# Altium PCB Custom_Keyboard.PcbDoc (part 4 of 4)
Units mil, origin at the board's own origin, x right, y up, seen from the top; angles counter-clockwise.
Board outline 4767 x 2153 mil, 2 copper layers (Top Layer, Bottom Layer), stack 57 mil thick; 298 components, 247 nets, 1117 pads, 576 vias.
Unrouted connection lines stored in the file: 2.
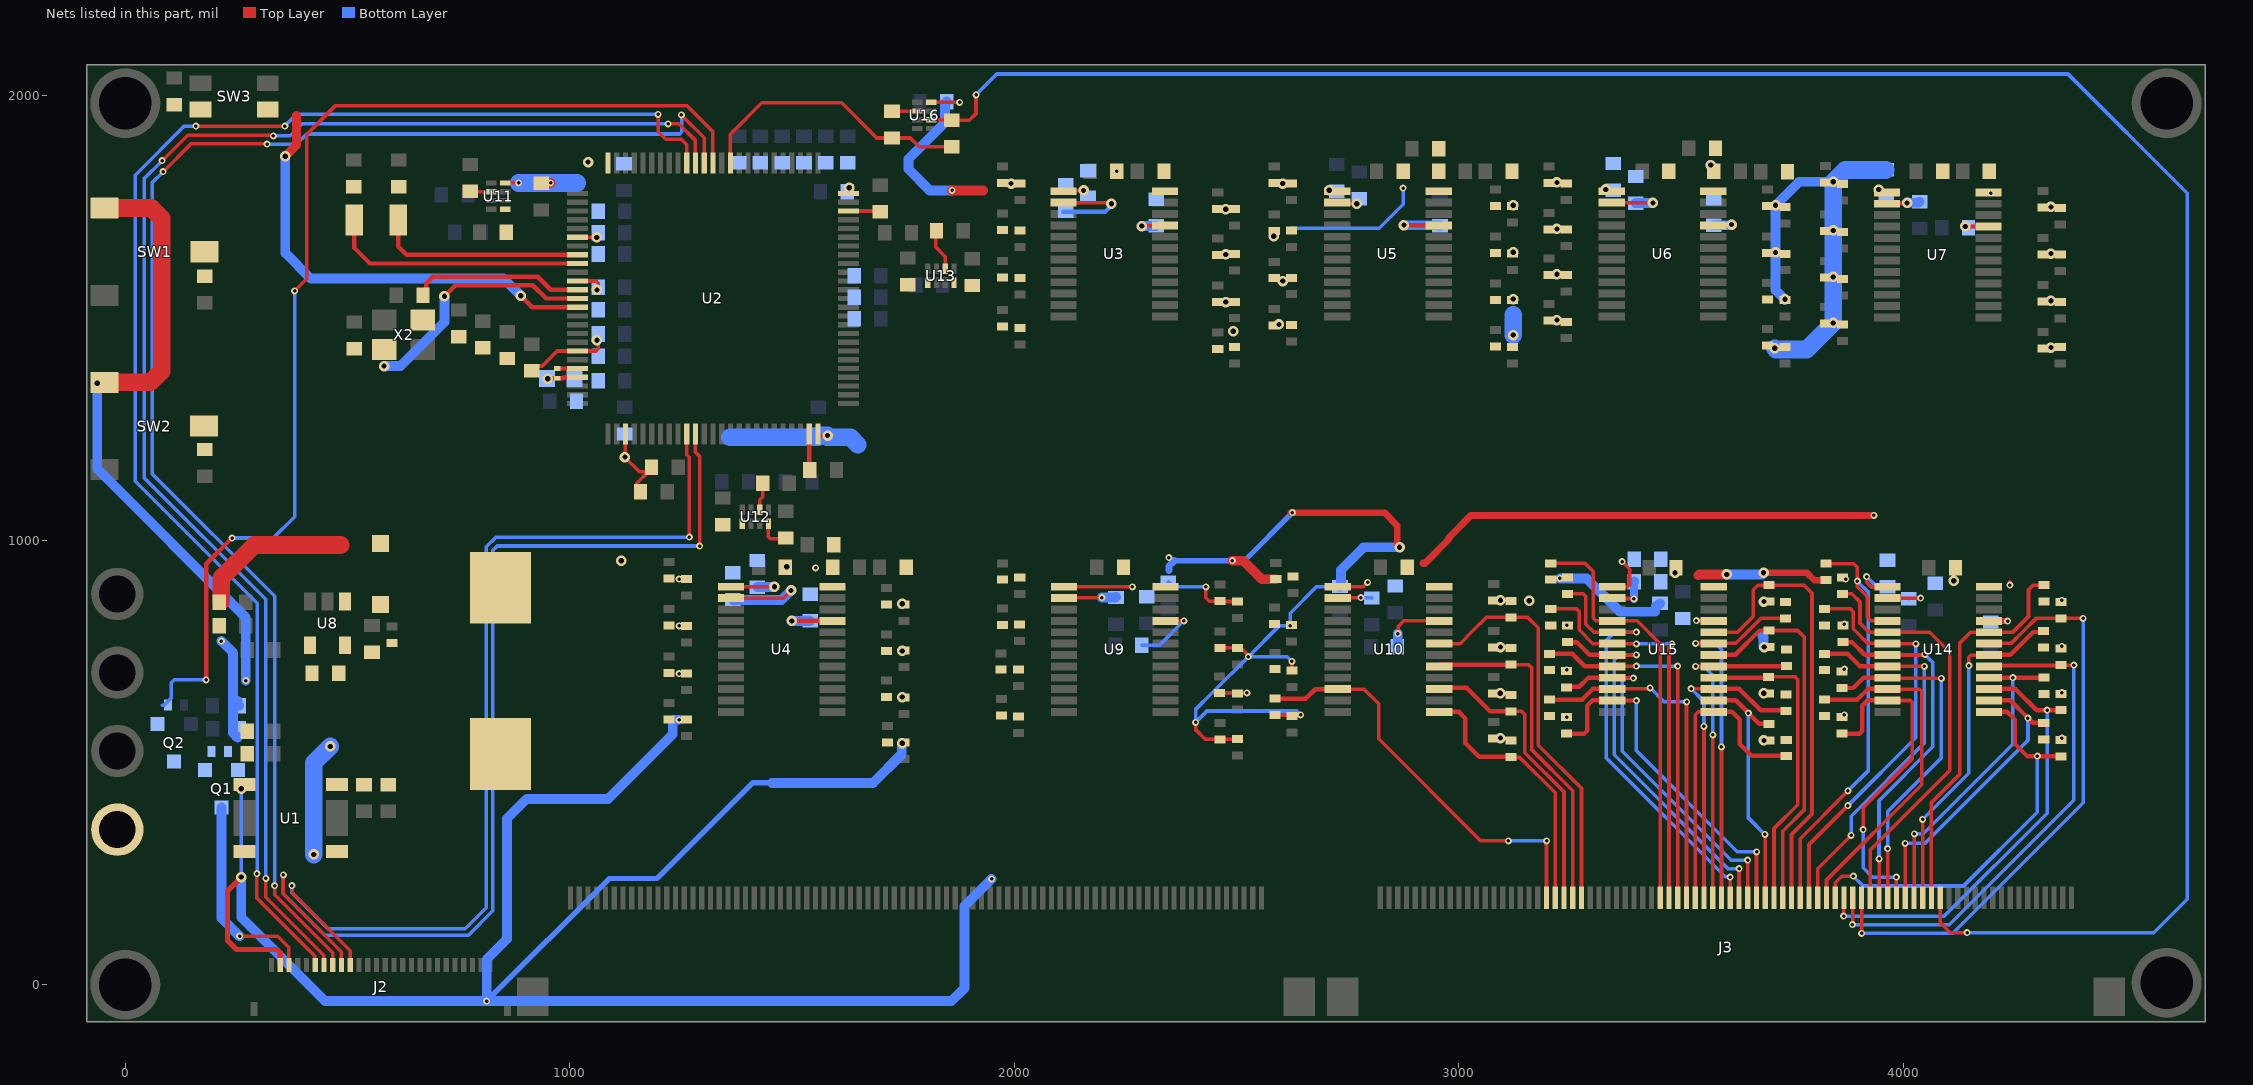
[diagram p3: the nets of this part, all layers, seen from the top]

## Via types
v1: diameter 15.75, hole 7.87, Top Layer to Bottom Layer, tented both sides, 451 vias
v2: diameter 23.62, hole 11.81, Top Layer to Bottom Layer, tented both sides, 125 vias

## Nets (pads, with @x,y where several pads share a name; then routed paths per layer and width w, separated by ;. In a path a pad name is that pad's centre, name@x,y a point inside that pad or via, vN(x,y) a via of type N, cw(c..) or ccw(c..) an arc to the next point about the centre after c; other vN are vias at no path point) (continued)
MUX_7.SDA_52: J3.20 R170.1 U10.10 | length 935.6
  Top Layer w8: U10.10@2728,664.93 2787.07,664.93 2820,632 2820,553 3049.67,323.33 v1(3112,323.33) ; J3.20@3197.66,195.44 v1@3197.66,323.33
  Top Layer w10: R170.1@2586.83,643.7 2656.26,643.7 2677.49,664.93 U10.10@2728,664.93
  Bottom Layer w8: v1(3112,323.33) v1(3198,323.33)
MUX_7.SDA_53: J3.21 R178.1 U10.13 | length 604.9
  Top Layer w8: R178.1@3118,512.7 3119.52,511.19 3137.81,511.19 3217.35,431.65 J3.21@3217.35,195.44
  Top Layer w10: U10.13@2956.35,613.75 2999.87,613.75 3014.96,598.66 3014.96,543.66 3045.91,512.7 R178.1@3118,512.7
MUX_7.SDA_54: J3.22 R186.1 U10.15 | length 664.4
  Top Layer w8: R186.1@3118,614.7 3142.3,614.7 3149,608 3149,522 3237.03,433.97 J3.22@3237.03,195.44
  Top Layer w10: U10.15@2956.35,667.64 3016.24,667.64 ; 3018.24,667.64 3071.17,614.7 R186.1@3118,614.7
MUX_7.SDA_55: J3.23 R194.1 U10.17 | length 765.2
  Top Layer w8: R194.1@3117.57,720.27 3156.73,720.27 3164,713 3164,529 3256.72,436.28 J3.23@3256.72,195.44
  Top Layer w10: U10.17@2957.8,720.27 R194.1@3117.57,720.27
MUX_7.SDA_56: J3.24 R202.1 U10.19 | length 904.6
  Top Layer w8: U10.19@2956.35,767.3 3003.23,767.3 3033.17,797.24 3062.14,826.2 R202.1@3118,826.2 3155.8,826.2 3179,803 3179,539 3276.4,441.6 J3.24@3276.4,195.44
MUX_8.SCL_57: J3.41 R151.1 U15.5 | length 1004
  Top Layer w8: R151.1@3244.65,879.32 3280.14,879.32 3286,873.46 3286,811.29 3303.88,793.41 U15.5@3345.65,793.41 ; U15.5@3345.65,792.89 3399.89,792.89 v1(3400,793) ; J3.41@3611.02,195.46 v1(3611,242)
  Bottom Layer w8: v1(3400,793) 3350.69,793 3332,774.31 3332,510 3599.45,242.55 3610.45,242.55 v1(3611,242)
MUX_8.SCL_58: J3.42 R159.1 U15.7 | length 889
  Top Layer w8: U15.7@3345.65,741.7 3401.7,741.7 v1@3402,742 ; J3.42@3630.73,195.44 v1@3630.73,260.51
  Top Layer w10: R159.1@3245.31,770.89 3265.81,770.89 3294.47,742.23 U15.7@3345.65,742.23
  Bottom Layer w8: v1(3400,742) 3362,742 3350,730 3350,517 3606,261 v1(3631.22,261)
MUX_8.SCL_59: J3.43 R167.1 U15.9 | length 811.8
  Top Layer w8: U15.9@3345.65,691.05 3346.44,690.26 3392.74,690.26 v1(3393,690) ; v1@3650.22,278 3650.32,277.9 J3.43@3650.32,195.54
  Top Layer w10: R167.1@3242.25,670.52 3271.59,670.52 3292.12,691.05 U15.9@3345.65,691.05
  Bottom Layer w8: v1(3393,690) 3375,690 3368,683 3368,525 3613,280 v1(3650.22,280)
MUX_8.SCL_60: J3.44 R175.1 U15.11 | length 796.3
  Top Layer w8: U15.11@3345.65,639.34 v1@3400.7,639.34 ; J3.44@3670,202 3670.16,202.16 3670.16,298.94 v1(3670.22,299)
  Top Layer w10: R175.1@3243,565.02 3282.97,565.02 3288.83,570.88 3288.83,627.52 3301.17,639.87 U15.11@3345.65,639.87
  Bottom Layer w8: v1(3400,639.05) 3400,526 3627,299 v1(3670.22,299)
MUX_8.SCL_61: J3.45 R183.1 U15.14 | length 577.6
  Top Layer w8: v1(3689,338) 3689.39,337.61 3689.39,195.83 J3.45@3689.79,195.44
  Top Layer w10: U15.14@3574,639.87 3623.13,639.87 3676.36,586.64 3692.51,586.64 R183.1@3696.65,582.5
  Bottom Layer w8: v1(3652,611) 3652,375 v1(3689,338)
MUX_8.SCL_62: J3.46 R191.1 U15.16 | length 705.3
  Top Layer w8: R191.1@3696,691.05 R191.1@3697.48,692.52 3756.84,692.52 3763,686.36 3763,405 3709.47,351.47 J3.46@3709.47,195.44
  Top Layer w10: U15.16@3574,691.05 R191.1@3696,691.05
MUX_8.SCL_63: J3.47 R199.1 U15.18 | length 839.6
  Top Layer w8: R199.1@3698.33,796.85 3763.15,796.85 3778,782 3778,394 3729.16,345.16 J3.47@3729.16,195.44
  Top Layer w10: U15.18@3574,742.23 3622.39,742.23 3677.01,796.85 R199.1@3698.33,796.85
MUX_8.SCL_64: J3.48 R207.1 U15.20 | length 1012.3
  Top Layer w8: U15.20@3574,793.41 3627.97,793.41 3633.83,799.27 3663,828.44 3663,888.88 3673.15,899.02 R207.1@3698,899.02 3776.98,899.02 3795,881 3795,384 3748.84,337.84 J3.48@3748.84,195.44
MUX_8.SDA_57: J3.33 R147.1 U15.4 | length 952
  Top Layer w8: R147.1@3207.07,948.09 3284.26,948.09 3302.83,929.52 3302.83,824.86 3307.37,820.32 ; 3308.68,819 U15.4@3345.65,819 ; U15.4@3345.65,818.48 3401.52,818.48 3453.57,766.43 J3.33@3453.57,195.44
MUX_8.SDA_58: J3.34 R155.1 U15.6 | length 905.6
  Top Layer w8: R155.1@3207.25,845.34 3265.14,845.34 3271,839.48 3271,798.35 3302.06,767.3 U15.6@3345.65,767.3 3400.7,767.3 v1@3401,767 ; J3.34@3473.25,195.44 3473.25,759.16 3480,765.9 v1@3480,768
  Bottom Layer w8: v1(3400,767) v1(3480,767)
MUX_8.SDA_59: J3.35 R163.1 U15.8 | length 819.2
  Top Layer w8: U15.8@3345.65,716.64 v1@3399.89,716.64 ; v1@3492.47,714.53 3492.47,195.91 J3.35@3492.94,195.44
  Top Layer w10: R163.1@3204,744.52 3255.83,744.52 3283.71,716.64 U15.8@3345.65,716.64
  Bottom Layer w8: v1(3400,716.75) v1(3492.47,716.75)
MUX_8.SDA_60: J3.36 R171.1 U15.10 | length 771
  Top Layer w8: U15.10@3345.65,665.46 3426.36,665.46 3428.9,668 v1(3431,668) ; J3.36@3512.62,195.44 v1@3512.62,635.9
  Top Layer w10: R171.1@3204.48,641.52 3277.87,641.52 3301.8,665.46 U15.10@3345.65,665.46
  Bottom Layer w8: v1(3431,668) 3462.91,636.09 v1@3510.81,636.09
  other v1: 3512.81,636.09
MUX_8.SDA_61: J3.37 R179.1 U15.13 | length 692.6
  Top Layer w8: J3.37@3532.31,195.44 3532.31,607.31 3538.75,613.75 U15.13@3574,613.75
  Top Layer w10: U15.13@3574,614.28 3614.82,614.28 3632.61,596.48 3632.61,541.48 3659.09,515 R179.1@3737,515
MUX_8.SDA_62: J3.38 R187.1 U15.15 | length 716.5
  Top Layer w8: v1(3523,666) 3523.53,665.47 3573.47,665.47 U15.15@3574,664.93 ; J3.38@3551.99,195.44 v1(3552,581)
  Top Layer w10: U15.15@3574,665.46 3631.54,665.46 3679.48,617.52 R187.1@3736.65,617.52
  Bottom Layer w8: v1(3523,666) 3552,637 v1(3552,581)
MUX_8.SDA_63: J3.39 R195.1 U15.17 | length 754.3
  Top Layer w8: v1(3533,716) 3533.06,716.06 3573.94,716.06 U15.17@3574,716.11 ; J3.39@3571.68,195.44 3571.68,561.68 v1(3572,562)
  Top Layer w10: U15.17@3574,716.11 3728.74,716.11 3733.72,721.09 R195.1@3737.22,721.09
  Bottom Layer w8: v1(3533,716) 3533.87,715.13 3552.87,715.13 3572,696 v1(3572,562)
MUX_8.SDA_64: J3.40 R203.1 U15.19 | length 849.3
  Top Layer w8: v1(3533,768) 3533.35,767.65 3573.65,767.65 U15.19@3574,767.3 ; U15.19@3574,767.82 3623.59,767.82 3650.83,795.05 3679.8,824.02 R203.1@3735.65,824.02 ; J3.40@3591.36,195.44 v1(3591.36,535)
  Bottom Layer w8: v1(3533,768) 3578,768 3591.36,754.64 v1(3591.36,535)
MUX_9.SCL_65: J3.57 R152.1 U14.5 | length 949.9
  Top Layer w8: R152.1@3863.83,879.3 3884.7,879.3 3903,861 3903,813.43 3923.05,793.39 U14.5@3964.83,793.39 ; J3.57@3926.01,195.44 3926.01,303.01 4105,482 4105,748 4060.11,792.89 U14.5@3964.83,792.89
MUX_9.SCL_66: J3.58 R160.1 U14.7 | length 802.4
  Top Layer w8: J3.58@3945.69,195.44 3945.85,195.59 3945.85,282.85 v1(3946,283) ; U14.7@3964.83,741.7 4046.7,741.7 4048,743 v1(4049,743)
  Top Layer w10: R160.1@3864.48,770.87 3884.98,770.87 3913.64,742.2 U14.7@3964.83,742.2
  Bottom Layer w8: v1(3946,283) 3945.69,283.31 3945.69,413.69 4067,535 4067,725 v1(4049,743)
MUX_9.SCL_67: J3.59 R168.1 U14.9 | length 780.8
  Top Layer w8: U14.9@3964.83,690.52 3965.59,689.76 4088.24,689.76 v1@4089,689 ; v1(3965.09,305.91) 3965.19,305.81 3965.19,195.63 J3.59@3965.38,195.44
  Top Layer w10: R168.1@3862.42,667.5 3887.77,667.5 3911.29,691.02 U14.9@3964.83,691.02
  Bottom Layer w8: v1(3965.09,305.91) 3965,306 3965,389 4086,510 v1(4086,689)
MUX_9.SCL_68: J3.60 R176.1 U14.11 | length 772.5
  Top Layer w8: v1(3910,349) 3910,398 4021,509 4021,634 4015.66,639.34 U14.11@3964.83,639.34 ; J3.60@3985.03,195.47 v1(3985,242)
  Top Layer w10: R176.1@3862.17,565 3902.14,565 3908,570.86 3908,627.5 3920.34,639.84 U14.11@3964.83,639.84
  Bottom Layer w8: v1(3910,349) 3910,263 3931,242 v1(3985,242)
MUX_9.SCL_69: J3.61 R184.1 U14.14 | length 689
  Top Layer w8: J3.61@4004.75,195.44 v1@4004.75,317.75
  Top Layer w10: U14.14@4193.17,639.84 4241.16,639.84 v1(4281,600) 4292,589 R184.1@4316.33,589
  Bottom Layer w8: v1(4004.72,317.78) 4048.78,317.78 4281,550 v1(4281,600)
MUX_9.SCL_70: J3.62 R192.1 U14.16 | length 722.3
  Top Layer w8: J3.62@4024.59,195.59 4025.22,196.22 v1(4025.22,339.22)
  Top Layer w10: U14.16@4193.17,691.02 4261.48,691.02 R192.1@4316.18,691.02
  Bottom Layer w8: v1(4025.22,339.22) 4045.22,339.22 4247,541 v1(4247,691)
MUX_9.SCL_71: J3.63 R200.1 U14.18 | length 775.4
  Top Layer w8: J3.63@4044.12,195.44 v1(4044.12,371.88) ; v1(4148,718) 4148,736.67 4152.69,741.35 4192.82,741.35 U14.18@4193.17,741.7
  Top Layer w10: U14.18@4193.17,742.2 4241.56,742.2 4292.86,793.5 R200.1@4315.83,793.5
  Bottom Layer w8: v1(4044.12,371.88) 4148,475.76 v1(4148,718)
MUX_9.SCL_72: J3.64 R208.1 U14.20 | length 878.5
  Top Layer w8: J3.64@4063.8,195.44 4063.8,242 4063.8,409.8 4127,473 4127,768.24 4151.65,792.89 U14.20@4193.17,792.89 ; U14.20@4193.17,793.39 4247.14,793.39 4253,799.24 4282.17,828.42 4282.17,888.85 4292.32,899 R208.1@4317.17,899
MUX_9.SDA_65: J3.49 R148.1 U14.4 | length 1030.2
  Top Layer w8: J3.49@3768.53,195.44 3768.53,328.53 v1(3876,436) ; R148.1@3826.42,947.07 3888.93,947.07 3897,939 3897,895 3919,873 3919,827.83 3927.86,818.98 U14.4@3964.83,818.98
  Bottom Layer w8: v1(3876,436) 3922,482 3922,883 v1(3897,908)
MUX_9.SDA_66: J3.50 R156.1 U14.6 | length 928.2
  Top Layer w8: J3.50@3788.21,195.44 3788.21,315.21 v1(3876,403) ; R156.1@3826.42,845.32 3881.64,845.32 3888,838.96 3888,800.5 3920.7,767.8 U14.6@3964.83,767.8 ; U14.6@3964.83,767.3 3964.97,767.15 4028.54,767.15 v1(4028.69,767)
  Bottom Layer w8: v1(3876,403) 4028.69,555.69 v1(4028.69,767)
MUX_9.SDA_67: J3.51 R164.1 U14.8 | length 856.2
  Top Layer w8: J3.51@3807.9,195.44 3807.9,260.9 v1(3883,336) ; U14.8@3964.83,716.11 4047.89,716.11 v1(4048,716)
  Top Layer w10: R164.1@3823.17,744.5 3875,744.5 3902.89,716.61 U14.8@3964.83,716.61
  Bottom Layer w8: v1(3883,336) 3883,379 4048,544 v1@4048,715.73
MUX_9.SDA_68: J3.52 R172.1 U14.10 | length 783.8
  Top Layer w8: J3.52@3827.58,195.44 3827.58,235.58 4042,450 4042,660.25 4037.31,664.93 U14.10@3964.83,664.93
  Top Layer w10: R172.1@3823.65,641.5 3897.04,641.5 3920.97,665.43 U14.10@3964.83,665.43
MUX_9.SDA_69: J3.53 R180.1 U14.13 | length 933.7
  Top Layer w8: J3.53@3847.27,195.44 3847.27,229.27 3853.12,235.12 3862.13,244.13 3887.87,244.13 v1(3888,244)
  Top Layer w10: U14.13@4193.17,614.25 4233.99,614.25 4251.79,596.45 4251.79,541.45 4279.74,513.5 v1@4302,513.5 ; v1@4302.5,513.5 R180.1@4354.83,513.5
  Bottom Layer w8: v1(3888,244) 3910,222 4136,222 4302,388 v1(4302,514)
MUX_9.SDA_70: J3.54 R188.1 U14.15 | length 1009.4
  Top Layer w8: v1(3866,154) 3866.48,154.48 3866.48,194.96 J3.54@3866.95,195.44
  Top Layer w10: U14.15@4193.17,665.43 4252.57,665.43 4300.5,617.5 4324,617.5 R188.1@4354.83,617.5
  Bottom Layer w8: v1(3866,154) 4092,154 4324,386 v1(4324,618)
MUX_9.SDA_71: J3.55 R196.1 U14.17 | length 1165.6
  Top Layer w8: v1(3886,135) 3886.32,135.32 3886.32,193.4 J3.55@3886.82,193.9 ; R196.1@4355.43,719.03 v1(4384,719)
  Top Layer w10: U14.17@4194.63,718.07 R196.1@4354.39,718.07
  Bottom Layer w8: v1(3886,135) 4104,135 4384,415 v1(4384,719)
MUX_9.SDA_72: J3.56 R204.1 U14.19 | length 1353.4
  Top Layer w8: J3.56@3906.32,195.44 J3.56@3907.66,194.1 ; v1(3906.66,115.34) J3.56@3906.66,194.1 ; U14.19@4193.17,767.8 4242.76,767.8 4270,795.03 4298.97,824 R204.1@4354.83,824 v1(4405,824)
  Bottom Layer w8: v1@3905,115.34 v1(3906.66,115.34) 4111.34,115.34 4405,409 v1(4405,824) v1@4405,825
NetC14_1: C14.1 U2.49 | length 81.3
  Top Layer w10: U2.49@1538.65,1238.76 1538.65,1159.35 C14.1@1540,1158
NetC15_1: C15.1 U2.73 | length 72.5
  Top Layer w10: U2.73@1627.23,1740.73 1697.27,1740.73 C15.1@1699,1739
NetQ1_1: Q1.1 Q2.3 R4.2
NetR2_2: R2.2 SW1.2
NetR3_2: R3.2 SW2.2
NetR7_1: R7.1 U9.1 | length 153.9
  Top Layer w8: U9.1@2112.17,895.25 2265.75,895.25 v1(2266,895)
NetR8_1: R8.1 U9.2 | length 117.8
  Top Layer w8: U9.2@2112.17,869.66 2112.84,870.33 2196.33,870.33 v1(2197,871)
  Bottom Layer w22: v1(2197,871) 2228,871 R8.1@2229,872
NetR10_1: R10.1 U3.1 | length 45.9
  Top Layer w8: U3.1@2110.83,1785.25 2111.7,1786.12 2155.12,1786.12 v2(2156,1787)
NetR12_1: R12.1 U3.2 | length 233.1
  Top Layer w8: U3.2@2110.83,1759.66 2111.56,1758.92 2220.89,1758.92 v2@2222.81,1757
  Bottom Layer w10: R12.1@2110,1739.5 R12.1@2116,1739.5 2205.31,1739.5 v2@2222.81,1757
  other v2: 2218.81,1757
NetR14_1: R14.1 U4.1 | length 136.3
  Top Layer w8: U4.1@1362.83,895.25 1362.89,895.31 1460.31,895.31 v2(1460.38,895.37)
  Bottom Layer w22: R14.1@1422,894.5 1422.56,895.06 1460.07,895.06 v2(1460.38,895.37)
NetR15_1: R15.1 U3.21 | length 86
  Top Layer w8: v2(2287,1707) 2287.74,1707.74 2338.44,1707.74 U3.21@2339.17,1708.48
  Bottom Layer w22: v2(2287,1707) 2287.25,1707.25 2319.75,1707.25 R15.1@2320,1707.5
NetR16_1: R16.1 U4.2 | length 283.9
  Top Layer w8: U4.2@1362.83,869.66 1480.66,869.66 v2(1498,887)
  Bottom Layer w22: R16.1@1367,866.5 1369.5,864 1371,865.5 1476.5,865.5 v2(1498,887)
NetR18_1: R18.1 U4.21 | length 139.6
  Top Layer w10: v2(1499.52,818.48) U4.21@1591.17,818.48
  Bottom Layer w22: v2(1499.52,818.48) R18.1@1541,818.5 ; R18.1@1531.51,819.5 R18.1@1538,819.5
NetR21_1: R21.1 U5.1 | length 19.5
  Top Layer w8: U5.1@2708.75,1786.75 v2(2708.75,1787.33) 2710.83,1785.25 U5.1@2726.83,1785.25
NetR22_1: R22.1 U5.2 | length 45.3
  Top Layer w8: U5.2@2726.83,1759.66 2728.22,1758.27 2769.58,1758.27 v2(2770.97,1756.88)
NetR24_1: R24.1 U5.21 | length 160.4
  Top Layer w10: v2(2876.81,1709) 2877.07,1708.74 2954.91,1708.74 U5.21@2955.17,1708.48
  Bottom Layer w22: v2(2876.81,1709) 2877.12,1708.69 2956.81,1708.69 R24.1@2958,1707.5
NetR28_1: R28.1 U9.21 | length 158
  Top Layer w8: U9.21@2340.52,818.48 v1(2381.48,818.48)
  Bottom Layer w8: R28.1@2287,764 2327,764 v1(2381.48,818.48)
NetR29_1: R29.1 U6.1
  other v2: 3330.75,1789.33
NetR30_1: R30.1 U7.1
  other v2: 3945,1789
NetR31_1: R31.1 U6.2 | length 131.8
  Top Layer w8: U6.2@3344.65,1759.66 3344.98,1759.33 3436.67,1759.33 v2(3437,1759)
  Bottom Layer w22: R31.1@3398,1758.5 3398.25,1758.75 3436.75,1758.75 v2(3437,1759)
NetR33_1: R33.1 U7.2 | length 75.2
  Top Layer w10: U7.2@3963.65,1757.09 3964.61,1758.05 4008.05,1758.05 v2(4009,1759)
  Bottom Layer w22: v2(4009,1759) 4009.31,1759.31 4034.89,1759.31 R33.1@4037.08,1761.5
NetR35_1: R35.1 U6.21 | length 82.8
  Top Layer w8: U6.21@3573,1708.48 3573.89,1709.37 3613.27,1709.37 v2(3614.16,1710.26)
  Bottom Layer w22: R35.1@3574,1708.5 3580.17,1708.5 3580.5,1708.83 3612.29,1708.83 3613.72,1710.26 v2(3614.16,1710.26)
NetR36_1: R36.1 U7.21 | length 51.9
  Top Layer w10: v2(4140.09,1705.91) U7.21@4192,1705.91
NetR119_1: R119.1 U10.1 | length 71
  Top Layer w8: U10.1@2728,895.25 2785.25,895.25 v1(2795,905)
NetR134_1: R134.1 U10.2 | length 77
  Top Layer w8: U10.2@2728,869.66 2728.67,870.33 2779.33,870.33 v1(2780,871)
  Bottom Layer w8: v1(2780,871) 2803,871 R134.1@2804,870
NetR136_1: R136.1 U10.21 | length 144.3
  Top Layer w8: v1(2863,790) 2864.48,791.48 2864.48,806.48 2876.48,818.48 U10.21@2956.35,818.48
  Bottom Layer w22: R136.1@2862,760 2863,761 v1(2863,790)
NetR137_1: R137.1 U14.1 | length 147.7
  Top Layer w8: v1@3918,917 3918,905 3929,894 3963.58,894 U14.1@3964.83,895.25 3944.16,895.25 U14.1@3939.3,900.11
  Bottom Layer w8: v1(3918,918) 3940.01,895.99 3964.09,895.99 R137.1@3964.83,895.25
NetR138_1: R138.1 U15.1 | length 100.7
  Top Layer w8: U15.1@3345.65,895.25 3380.56,895.25 3385.25,899.93 3385.25,934.75 v1(3368,952)
NetR139_1: R139.1 U14.2 | length 102.2
  Top Layer w8: U14.2@3964.83,869.66 v1(4039.66,869.66)
  Bottom Layer w8: R139.1@4013,868 4014.66,869.66 v1(4039.66,869.66)
NetR141_1: R141.1 U15.2 | length 90.4
  Top Layer w8: U15.2@3345.65,869.66 3346.48,868.83 3395.17,868.83 v1@3396,868
  Bottom Layer w18: v1(3394,868) R141.1@3394,906
  Bottom Layer w22: R141.1@3394,906 R141.1@3395,907
NetR143_1: R143.1 U14.21 | length 80.9
  Top Layer w12: U14.21@4193.17,818.48 4234.52,818.48 v1(4235,818)
  Bottom Layer w12: R143.1@4197,816 4198.28,817.28 4234.28,817.28 v1(4235,818)
NetR144_1: R144.1 U15.21 | length 39.2
  Top Layer w8: v1(3535,819) 3535.52,818.48 U15.21@3574,818.48
NetSB7_2: SB7.2 U12.2 | length 61.8
  Top Layer w8: U12.2@1427.31,1069 1427.31,1091.32 1434,1098 SB7.2@1434,1128
NetSB8_2: SB8.2 U11.2 | length 47.4
  Top Layer w8: SB8.2@776,1785.32 777,1784.32 U11.2@823,1784.32
NetSB9_2: SB9.2 U12.5
NetSB10_2: SB10.2 U11.5
NetSB11_2: SB11.2 U13.2 | length 91.1
  Top Layer w8: SB11.2@1825,1692 1822.99,1689.99 1822.99,1660.01 1844.84,1638.16 U13.2@1844.84,1610.75
NetSB12_2: SB12.2 U13.5
NetSB13_2: SB13.2 U16.2 | length 48.3
  Top Layer w8: SB13.2@1725,1965 SB13.2@1725.69,1965.69 ; SB13.2@1734.69,1965.69 U16.2@1782,1965.69
NRST: C18.1 SW3.1 U2.14 | length 1027.4
  Top Layer w10: v2(889.84,1550) 915.65,1524.2 U2.14@1016.99,1524.2
  Top Layer w20: v2(360,1864) 385,1889 385,1955.64
  Bottom Layer w22: v2(360,1864) 360,1646 417,1589 850.84,1589 v2(889.84,1550)
OLED_IO: Q2.1 R5.2 U2.88 | length 2553
  Top Layer w8: v1(381,1561) 408,1588 408,1913 473,1978 1263,1978 1322.11,1918.89 U2.88@1322.11,1849
  Top Layer w10: v1(182,686) 182,947 v1(240,1005)
  Bottom Layer w8: 83,629 87,629 103,645 103,679 110,686 v1(182,686) ; v1(240,1005) 333,1005 381,1053 v1(381,1561)
OLED_RST: SB13.1 SB14.1 U2.86 | length 623.2
  Top Layer w8: U2.86@1361.48,1849 1361.48,1913.48 1432,1984 1612,1984 1691,1905 SB13.1@1725,1905 1766,1905 1786,1885 SB14.1@1850,1885
OLED_RST#: J3.65 SB14.2 U16.6 | length 5250.7
  Top Layer w8: U16.6@1813.5,1946 SB14.2@1858,1946 ; SB14.2@1861.5,1945 SB14.2@1859,1945 1899,1945 1914,1960 v1@1914,2006 ; J3.65@4083.49,195.44 4083.24,195.2 4083.24,139.76 4106,117 v1(4144,117)
  Bottom Layer w8: v1(1914,2002) 1961,2049 4371,2049 4639,1781 4639,192 4564,117 v1(4144,117)
ROW_1: J2.17 U2.35 | length 2251.8
  Top Layer w8: v1(374.69,223) 375.4,222.29 375.4,206.6 505.8,76.2 J2.17@505.8,44 ; U2.35@1263.06,1238.76 1263.06,1192.54 1269,1186.6 v1(1269,1007)
  Bottom Layer w8: v1(374.69,223) 374.69,207.31 456,126 765,126 812,173 812,985 834,1007 v1(1269,1007)
ROW_2: J2.18 U2.36 | length 2348.6
  Top Layer w8: v1(355.43,247.07) 355.43,204.57 486.12,73.88 J2.18@486.12,44 ; U2.36@1282.74,1218.76 1282.74,1198.26 1292,1189 v1(1292,987)
  Bottom Layer w8: v1(355.43,247.07) 355.43,204.57 449,111 772,111 827,166 827,977 837,987 v1(1292,987)
ROW_3: J2.19 U2.89 | length 3335.7
  Top Layer w8: v1(85.09,1829.35) 147.75,1892 v1@319,1892 ; v1(336,223) 336,202 466.43,71.57 J2.19@466.43,44 ; v1(1251,1957) 1251,1956.9 1302.71,1905.19 1302.71,1849.29 U2.89@1302.43,1849
  Bottom Layer w8: v1(85.09,1829.35) 61,1805.25 61,1148.75 336,873.75 v1(336,223) ; v1(319,1891) 386,1891 ; 386,1892 408,1914 1247.48,1914 1252.17,1918.69 1252.17,1955.83 v1(1251,1957)
ROW_4: J2.20 U2.90 | length 3293.4
  Top Layer w8: v1(83,1853.95) 140.05,1911 332,1911 v1(333,1910) ; v1(316.05,239.07) 316.05,196.95 446.56,66.44 446.56,44.19 J2.20@446.75,44 ; v1(1221,1937) 1221.13,1937.13 1244.87,1937.13 1282.74,1899.26 U2.90@1282.74,1849
  Bottom Layer w8: v1(83,1853.95) 42.13,1813.07 42.13,1140.93 315.84,867.22 315.84,416 ; 316,247.07 316,422 ; v1(333,1910) 371,1910 398,1937 v1(1221,1937)
ROW_5: J2.21 U2.91 | length 3336.2
  Top Layer w8: v1(158.87,1931.87) 358.87,1931.87 v1(359,1932) ; v1(296,250) 296,195 425.72,65.28 425.72,45.34 J2.21@427.06,44 ; v1(1199,1958) 1199,1919 1216,1902 1251,1902 1263.06,1889.94 U2.91@1263.06,1849
  Bottom Layer w8: v1(158.87,1931.87) 132.87,1931.87 22.29,1821.29 22.29,1132.71 297,858 297,250 v1@296,249 ; v1(359,1932) 385,1958 v1(1199,1958)
SHD: R133.1 U8.4
SW: D1.1 L2.2 U8.1
VCC_3V3: C3.1 C4.1 C5.1 C6.1 C7.1 C8.1 C9.1 C10.1 C11.1 C12.1 C13.1 C21.1 C22.1 C23.1 C24.1 C25.1 C29.1 C32.1 C33.1 C34.1 C35.1 C36.1 C37.1 C38.1 C39.1 C40.1 C41.1 J2.25 L1.1 R6.2 R9.1 R10.2 R11.1 R12.2 R13.1 R14.2 R15.2 R16.2 R17.1 R18.2 R19.1 R20.1 R23.1 R25.1 R26.1 R27.1 R29.2 R30.2 R31.2 R32.1 R34.1 R35.2 R37.2 R38.2 R39.2 R40.2 R41.2 R42.2 R43.2 R44.2 R45.2 R46.2 R47.2 R48.2 R49.2 R50.2 R51.2 R52.2 R53.2 R54.2 R55.2 R56.2 R57.2 R58.2 R59.2 R60.2 R61.2 R62.2 R63.2 R64.2 R65.2 R66.2 R67.2 R68.2 R69.2 R70.2 R71.2 R72.2 R73.2 R74.2 R75.2 R76.2 R77.2 R78.2 R79.2 R80.2 R81.2 R82.2 R83.2 R84.2 R85.2 R86.2 R87.2 R88.2 R89.2 R90.2 R91.2 R92.2 R93.2 R94.2 R95.2 R96.2 R97.2 R98.2 R99.2 R100.2 R101.2 R102.2 R103.2 R104.2 R105.2 R106.2 R107.2 R108.2 R109.2 R110.2 R111.2 R112.2 R113.2 R114.2 R115.2 R116.2 R117.2 R118.2 R120.2 R121.2 R122.2 R123.2 R124.2 R125.2 R126.2 R127.2 R128.2 R129.2 R130.2 R131.2 R132.2 R135.1 R137.2 R138.2 R140.1 R141.2 R142.1 R145.2 R146.2 R147.2 R148.2 R149.2 R150.2 R151.2 R152.2 R153.2 R154.2 R155.2 R156.2 R157.2 R158.2 R159.2 R160.2 R161.2 R162.2 R163.2 R164.2 R165.2 R166.2 R167.2 R168.2 R169.2 R170.2 R171.2 R172.2 R173.2 R174.2 R175.2 R176.2 R177.2 R178.2 R179.2 R180.2 R181.2 R182.2 R183.2 R184.2 R185.2 R186.2 R187.2 R188.2 R189.2 R190.2 R191.2 R192.2 R193.2 R194.2 R195.2 R196.2 R197.2 R198.2 R199.2 R200.2 R201.2 R202.2 R203.2 R204.2 R205.2 R206.2 R207.2 R208.2 SW1.1 SW2.1 U1.1 U2.6 U2.11 U2.19 U2.28 U2.50 U2.75 U2.100 U3.24 U4.24 U5.24 U6.24 U7.24 U9.24 U10.24 U11.8 U12.8 U13.8 U14.24 U15.24 U16.8 | length 13007.7
  Top Layer w8: U11.8@854.5,1804 v1(885,1804) ; R113.2@914,1381 925,1392 938.33,1392 953,1406.67 972.1,1425.77 U2.19@1016.99,1425.77 1059.18,1425.77 1063.87,1430.46 1063.87,1447.87 v2@1064,1448 ; U2.11@1016.99,1583.25 1059.18,1583.25 1063.87,1578.57 1063.87,1561.16 v2@1064,1561.02 ; U2.6@1016.99,1681.68 1017.33,1681.34 v2(1060.66,1681.34) ; U2.28@1125.26,1238.76 1125.26,1188.26 v2(1124,1187) 1156.5,1154.5 1177,1154.5 1151,1128.5 ; R44.2@1263,913 1264,913 R44.2@1266,915 ; U12.8@1447,1037.5 1447,1007.69 1451.69,1003 1484,1003 C36.1@1486,1005 ; v1@1552,938 v1(1553,938) ; U2.50@1558.33,1238.76 1558.33,1237.41 1560.24,1235.5 v2(1580,1235.5) ; U4.24@1577.75,895.25 U4.24@1591.17,895.25 ; U16.8@1813.87,1985 v1(1877,1985) ; v1(2231,1830) C22.1@2231,1830.5 ; v1(2408,590) 2408,574 2429.43,552.57 R177.2@2502.17,552.57 ; v1(2431,895) 2431,870.74 2438.67,863.07 R205.2@2463.17,863.07 ; R205.2@2460.67,862.07 R201.2@2502.17,862.07 ; R189.2@2462,656.5 v1(2523.5,656.5) ; R197.2@2463.17,758 R193.2@2504,758 ; R193.2@2502,757 2505.5,757 2510.5,752 2516,752 v1@2528,740 ; R170.2@2586.83,606.7 2647.11,606.7 v1@2647.41,607 ; R166.2@2624.59,706.7 v1@2624.59,725.41 ; v1(4240,899) v1@4240,906
  Top Layer w10: R9.1@1582,950 1592,940 R9.1@1592,939 ; R65.2@1973.5,1481 R65.2@1974,1480.5
  Top Layer w12: v2(261,242) 230,211 230,99 250,79 341.29,79 348.32,71.97 J2.25@348.32,44
  Top Layer w15: v1@2621.87,1062 v1(2626,1062) 2833,1062 2861.5,1033.5 2861.5,989.5 v2(2867,984) ; v2(3686,927) 3783,927 3799.93,910.07 R148.2@3826.42,910.07
  Top Layer w16: 2920.09,948.25 2923.92,948.25 2978.17,1002.5 2978.17,1006.34 3027.84,1056 v1(3934.49,1056)
  Top Layer w22: C38.1@936,1803 936.69,1803.69 v1@957,1803.69 ; v1(1860,1787) 1929.5,1787 ; v1(2491,954) 2515,954 2556.73,912.27 R146.2@2588.41,912.27 ; 3539.5,921 3541.5,923 v2(3603,923)
  Top Layer w40: SW2.1@-49.83,1353 SW2.1@-47.41,1355.43 56.57,1355.43 82,1380.86 82,1723.99 58.57,1747.43 SW1.1@-46.41,1747.43
  Bottom Layer w8: v2(261,242) v2(261,441) ; R26.1@2347,906 2358,895 v1@2427,895 ; v1(2523.5,656.5) 2445.5,656.5 ; 2620,1700 2622,1702 2821,1702 2875,1756 v1(2875,1792) ; v1(2624.59,727.41) 2614,738 v1(2527,738) ; v1(2644.41,607) 2635.66,615.75 2433.75,615.75 v1(2408,590) 2408,619 2445.5,656.5 ; R135.1@2733,896 2732.19,895.19 2680.19,895.19 2621,836 v1(2621,808) 2597,808 v1(2527,738) ; 2445.5,656.5 v1(2527,738)
  Bottom Layer w10: v2@2474,1645 v2(2476,1643) ; v2@2593.62,1487.25 v2(2595.49,1485.39)
  Bottom Layer w12: v1(813,-37) 1089,239 1196,239 1411,454 1455,454 ; 2360,954 v1(2491,954) 2491.72,954.72 2518.72,954.72 v1(2626,1062)
  Bottom Layer w16: 2348,932.5 2348,942 2360,954
  Bottom Layer w22: v2(-63,1353) -63,1160 271,826 v1(271,684) ; v2(261,242) 261,151.01 449.01,-37 v1(813,-37) ; v1(1246,596) 1235.85,596 1231.85,592 1231.85,563.85 1086,418 903,418 859,374 859,103 813,57 v1(813,-37) ; 1455,454 1682.57,454 1747,518.43 1747,543 v2(1748,543) ; C39.1@1846.5,1984 C39.1@1845,1984 ; C39.1@1848,1987 C39.1@1845,1984 ; v1(1860,1787) 1810,1787 1762,1835 1762,1858 1844,1940 1844,1983 C39.1@1845,1984 ; v1(1949,238) 1888,177 1888,-8 1859,-37 v1(813,-37) ; v2@2492.69,1470.31 v2(2493,1470) ; R135.1@2733,896 2735.08,898.08 2735.08,933.08 2786,984 v2(2867,984) ; v1(3228,914) 3288,914 3363,839 3441.92,839 ; R142.1@3444,852 3447,852 R142.1@3453,858 ; v2@3566,1845 v2(3567,1844) ; v2(3603,923) v2@3683,923 ; 3683,784.61 3686,781.61 v2@3686,759.5 ; v2@3733.87,1541.69 3732.75,1542.81 3713,1562.56 v2(3713,1647.5) v2(3713,1753.5) 3765.93,1806.43 v2(3843,1806.43)
  Bottom Layer w40: v1(885,1804) v1(957,1804) 1016,1804 ; 1360.5,1231.5 C9.1@1559,1231.5 ; C9.1@1559,1236 1579.5,1236 v2(1580,1235.5) ; v2@1579.5,1231.5 1631.5,1231.5 1648,1215 ; v2(3123,1461.48) 3123,1507 ; v2(3711,1432) 3714,1429 3783.07,1429 v2(3843,1488.93) v2(3843,1592.5) v2(3843,1697) v2(3843,1806.43) 3869.57,1833 R30.2@3960.72,1833
  other v1: 4357.02,554.68 3243,602.02 3867.61,607.18 4357.02,657.18 1246,700 3243,708.18 3867.61,710.18 4357.02,761.18 1246,807.5 3243,809 3867.61,811 4357.02,864.68 1246,912.5 3870.61,912.75 2348,961 4197,1781
  other v2: 3687,549.48 3094,555 1748,647 3093.83,655.5 3686.48,655.5 1748,751 3094,759.5 3687.65,759.5 1748,857 3687,862 3159,864 3094,865 4114,909 3487,927 1488.44,940.08 1116,954 4332.65,1433.43 1061,1450 3221,1495.5 2476,1536 4332.65,1538.93 3734,1542 3123,1542.5 1061,1563.02 2604,1583 3221,1598.5 4332.65,1644.93 3123,1648 2584,1684 3221,1700.5 2476,1744.5 4332.65,1750 3123,1753.5 1629,1793 1993,1802.5 2604,1802.5 3221,1805 1041,1851
VCC_5V: C1.1 C2.1 C26.1 C30.1 L2.1 P1.1 R133.2 U1.3 U1.4 U1.6 U8.5 | length 258.3
  Bottom Layer w40: v2(424,293) 424,499 v2(461,536)
VCC_7V5: C27.1 C28.2 C31.1 D1.2 Q1.2 R4.1 RF1.1 | length 615.1
  Top Layer w22: C28.2@211,860 C28.2@214.5,863.5
  Top Layer w40: C28.2@216,863.5 216,915 290,989 484,989
  Bottom Layer w22: v1(216,773) 242,747 242,566.5 253,555.5 ; C27.1@253,638 243,638 253,628 C27.1@256,628
VDD: J2.24 Q1.3 | length 467.5
  Top Layer w8: v1(257,109) 343,109 368.01,83.99 J2.24@368.01,44
  Bottom Layer w22: Q1.3@216.4,398.35 216.4,149.6 v1(257,109)
VDDA: L1.2 R1.2 U2.22 | length 68
  Top Layer w10: v2(950.55,1363.43) 951.55,1364.43 971.08,1364.43 R1.2@971.39,1364.75 985.75,1364.75 988,1367 1016.71,1367 U2.22@1016.99,1366.72
VREF: R1.1 U2.21 | length 45.6
  Top Layer w10: R1.1@971.39,1386.4 U2.21@1016.99,1386.4
XH_IN: C19.2 U2.12 X2.1 | length 395.2
  Top Layer w10: C19.2@660.7,1542.01 C19.2@660.7,1544.51 ; C19.2@669.61,1550.93 669.61,1560.61 676.8,1560.61 676.8,1577.8 692,1593 928,1593 957.43,1563.57 U2.12@1016.99,1563.57
XH_OUT: C20.2 U2.13 X2.3 | length 556.7
  Top Layer w10: v2(718,1549) 742.81,1573.81 916.92,1573.81 946.85,1543.88 U2.13@1016.99,1543.88
  Bottom Layer w22: v2(582,1392) 619,1392 718,1491 v2(718,1549)
XL_IN: C16.2 U2.8 X1.1 | length 470.3
  Top Layer w10: X1.1@613.93,1720.5 613.93,1661.07 632.69,1642.31 U2.8@1016.99,1642.31
XL_OUT: C17.2 U2.9 X1.2 | length 578.9
  Top Layer w10: X1.2@515.5,1720.5 515.5,1657.5 550.38,1622.62 U2.9@1016.99,1622.62
pads on no net: J2.22 J2.23 J3.66 J3.67 J3.68 J3.69 J3.70 J3.71 J3.72 J3.73 J3.74 J3.75 J3.76 J3.77 J3.78 J3.79 J3.80 U2.1 U2.2 U2.3 U2.4 U2.5 U2.7 U2.15 U2.23 U2.26 U2.29 U2.30 U2.31 U2.32 U2.38 U2.39 U2.40 U2.41 U2.42 U2.43 U2.44 U2.45 U2.46 U2.51 U2.52 U2.53 U2.54 U2.62 U2.68 U2.69 U2.72 U2.76 U2.77 U2.80 U2.95 U2.96 U2.97 U2.98 U16.3 U16.5 U16.7

## Polygon pours and split planes (outlines as drawn)
GND on Bottom Layer "Polygon_2" (hatched 45Degree grid 20 track 15, remove dead copper, pour order 1): 11,17 4581,17 4581,1967 11,1967
GND on Top Layer "Polygon_1" (hatched 45Degree grid 20 track 15, remove dead copper, pour order 0): 11,17 4580,17 4580,1967 11,1967

## Other copper
Top Layer:
  rectangle net VCC_3V3: 1938,237 1951,982
  rectangle net VCC_3V3: 2586,799 2636.42,820
  rectangle net VCC_3V3: 2573,807 2636.42,827
  rectangle net MUX_6.SCL_48: 2446.74,890.17 2480.17,918
  rectangle net GND: 1467,1046 1621,1068
  rectangle net VCC_3V3: 3132,851.2 3187,926
  rectangle net GND: 4428,-72 4676,90
  rectangle net GND: 2080,355 2216,383
  rectangle net GND: 2080,355 2165,623
  region net VCC_3V3: 4370.9,566 4298.9,566 4298.9,541 4370.9,541
  region net VCC_3V3: 4371.23,669.5 4299.23,669.5 4299.23,644.5 4371.23,644.5
  region net VCC_3V3: 4370.4,771.5 4298.4,771.5 4298.4,746.5 4370.4,746.5
  region net VCC_3V3: 4371.75,877 4299.75,877 4299.75,852 4371.75,852
  rectangle net GND: 4041,917 4074,963
  rectangle net GND: 3935,573 3995,623
  rectangle net VCC_3V3: 4093.17,886 4253,956
  region net VCC_3V3: 3881,926.07 3809,926.07 3809,901.07 3881,901.07
  region net VCC_3V3: 3878,616.5 3806,616.5 3806,591.5 3878,591.5
  region net VCC_3V3: 3878,718.5 3806,718.5 3806,693.5 3878,693.5
  region net VCC_3V3: 3877,823.32 3807,823.32 3807,798.32 3877,798.32
  rectangle net VCC_3V3: 3190.23,588 3255.23,614.18
  rectangle net VCC_3V3: 3190.75,696.43 3255.75,717
  rectangle net VCC_3V3: 3193,798.25 3258,818
  rectangle net VCC_3V3: 3064,851.2 3187,879
  rectangle net VCC_3V3: 3153,901 3257,926
  rectangle net VCC_3V3: 3675,536.5 3749,561.5
  rectangle net VCC_3V3: 3674.48,642.52 3751,667.52
  rectangle net VCC_3V3: 3675.65,744.52 3759.65,772
  rectangle net VCC_3V3: 3675,849.02 3759,874.02
  rectangle net VCC_3V3: 3474,886 3617,956
  rectangle net VCC_3V3: 3064,541.2 3137,566.2
  rectangle net VCC_3V3: 3063.83,641.7 3139.83,666.7
  rectangle net VCC_3V3: 3064,745.7 3140,770.7
  rectangle net VCC_3V3: 2572.41,898 2643,930
  rectangle net VCC_3V3: 2612,720 2640.59,735
  rectangle net VCC_3V3: 2573,697 2640.59,721
  rectangle net VCC_3V3: 2573,594 2657,620
  rectangle net VCC_3V3: 2445,746 2519,769
  rectangle net VCC_3V3: 3470,1851.5 3490,1939
  rectangle net GND: 150,-72 4676,-52
  rectangle net GND: 2614,-72 2775,16
  rectangle net VCC_3V3: 1545,886 1585,948
  rectangle net VCC_3V3: 1098,942 1137,1068
  rectangle net VCC_3V3: 1098,1053 1197,1204
  rectangle net GND: 2796,1973 3406,2031
  rectangle net GND: 2698,1301 3349,1329
  rectangle net GND: 2697,1301 2764,1513
  rectangle net VCC_3V3: 2216,1813 2250,1947
  rectangle net VCC_3V3: 1929,1467.5 1952,1538
  rectangle net GND: 2170,908 2202,957
  rectangle net VCC_3V3: 2228,911 2317,978
  rectangle net VCC_3V3: 1938,966 2370,982
  rectangle net VCC_3V3: 1938,591.5 2027,619.5
  rectangle net VCC_3V3: 1938,694.57 2026.52,722.57
  rectangle net VCC_3V3: 1938,795.5 2028,823.5
  rectangle net VCC_3V3: 1938,897.13 2029.59,925.13
  rectangle net GND: 1316,601 1396,623
  rectangle net VCC_3V3: 2854,886 2986.17,1010.5
  rectangle net VCC_3V3: 2310.35,886 2370.35,982
  rectangle net VCC_3V3: 2216,1924 2361,1950
  rectangle net VCC_3V3: 2304.17,1775.75 2369.17,1950
  rectangle net GND: 900,1720 958,1758
  rectangle net VCC_5V: -80,294 83,411
  rectangle net VCC_3V3: 237,431 297,709
  rectangle net GND: 91,2007.06 437,2055.06
  rectangle net VCC_3V3: 1931,1572 1948,1803
  rectangle net GND: 1850,1649 1871,1670
  rectangle net VCC_3V3: 3475,1910.5 4217,1939
  rectangle net GND: 2796,1813 2830,2031
  rectangle net VCC_5V: -80,266 501,319
  rectangle net GND: -82,-82 202,60
  rectangle net VCC_3V3: 2573,1571 2638,1604
  rectangle net VCC_3V3: 2481,1423 2514,1482
  rectangle net MRST2: 2261,1809.5 2293,1917
  region net GND: 1924,1670 1858.05,1670 1858.05,1599.05 1924,1599.05
  region net VCC_3V3: 1952,1590.95 1858.05,1590.95 1858.05,1534 1952,1534
  rectangle net GND: 1788,1599 1812,1632
  rectangle net NetSB12_2: 1742,1559 1812,1591
  rectangle net GND: 808,1825 908,1835
  rectangle net GND: 808,1798 835.5,1835
  rectangle net NetSB10_2: 842,1674 873,1751
  rectangle net I2C1_SCL: 774,1655 822,1717
  rectangle net XH_IN: 637,1471 697,1598
  rectangle net GND: 444,1470 624,1588
  rectangle net XL_OUT: 494.71,1685.5 535.71,1812.5
  rectangle net XL_IN: 593.71,1685.5 633.71,1812.5
  rectangle net VCC_3V3: 1741,842 1774,959
  rectangle net VCC_3V3: 1561,886 1621,1010.5
  rectangle net NetSB9_2: 1323,1018 1394,1050
  rectangle net GND: 1371,1057 1394,1099
  rectangle net VCC_3V3: 1931,1788.5 2031,1816.5
  rectangle net MRST3: 2842,1863 2910,1903
  rectangle net VCC_3V3: 3542.83,1776 3605.83,1938
  rectangle net VCC_3V3: 3449,1807.5 3490,1870
  rectangle net VCC_3V3: 4071,1799 4112,1937
  rectangle net VCC_3V3: 4161.83,1773.43 4222,1939
  rectangle net VCC_3V3: 3722,1739.5 3756,1931
  rectangle net VCC_3V3: 3104,1739.5 3135,1884
  rectangle net VCC_3V3: 3190,1791 3254,1819
  rectangle net VCC_3V3: 2955,1858 3135,1902
  rectangle net VCC_3V3: 2858,1776 2970,1851
  rectangle net NetR21_1: 2697,1776 2757,1848
  rectangle net VCC_3V3: 3069,1739.5 3133,1761
  rectangle net MUX_3.SCL_24: 3071,1775 3097,1799
  rectangle net VCC_3V3: 3190,1686.5 3254,1714.5
  rectangle net VCC_3V3: 3190,1481.5 3254,1509.5
  rectangle net MUX_3.SDA_21: 2925,1495 3000,1513
  rectangle net MUX_3.SCL_21: 3063,1459 3099,1487
  rectangle net VCC_3V3: 3110,1423 3136,1475
  rectangle net VCC_3V3: 3070,1423 3134,1451
  rectangle net VCC_3V3: 3190,1584.5 3254,1612.5
  rectangle net VCC_3V3: 3070,1634 3134,1662
  rectangle net VCC_3V3: 3070,1528.5 3134,1556.5
  rectangle net VCC_3V3: 1932,1685.5 2027,1710.5
  rectangle net GND: 2081,1458 2148,1513
  rectangle net VCC_3V3: 1929,1467.5 2029,1492.5
  rectangle net VCC_3V3: 1941,1578 2029,1603
  rectangle net MUX_2.SCL_14: 2426.21,1559 2474,1583
  rectangle net VCC_3V3: 2441,1522 2514,1550
  rectangle net VCC_3V3: 2565,1653 2602,1684
  rectangle net VCC_3V3: 2565,1676 2637,1710
  rectangle net VCC_3V3: 2445,1629 2514,1657
  rectangle net VCC_3V3: 2437,1419.93 2514,1451
  rectangle net VCC_3V3: 2437,1730.5 2514,1758.5
  rectangle net MUX_2.SDA_14: 2481,1489 2514,1515
  rectangle net VCC_3V3: 2573,1469.5 2642,1497.5
  rectangle net VCC_3V3: 2565,1788.5 2642,1816.5
  rectangle net VCC_3V3: 2920,1776 2985,1902
  rectangle net GND: 4014,1799 4045,1849
  rectangle net VCC_3V3: 3812,1683 3874,1711
  rectangle net NetR30_1: 3934,1774 3996,1808
  rectangle net VCC_3V3: 3812,1578.5 3877.35,1606.5
  rectangle net VCC_3V3: 3812,1792.43 3877.35,1820.43
  rectangle net VCC_3V3: 4301.65,1630.93 4367,1658.93
  rectangle net VCC_3V3: 4301.65,1524.93 4367,1552.93
  rectangle net VCC_3V3: 4301.65,1419.43 4367,1447.43
  rectangle net VCC_3V3: 4301.65,1736.43 4369,1764.43
  rectangle net VCC_3V3: 3812,1474.93 3877.35,1502.93
  rectangle net GND: 3933,1445 3995,1510
  rectangle net I2C3#.I2C3_SCL#: 3659,1807 3706,1853
  rectangle net GND: 3311,1472.59 3377,1513
  rectangle net VCC_3V3: 3682,1739.5 3746,1767.5
  rectangle net NetR29_1: 3314.83,1776 3374.83,1848
  rectangle net VCC_3V3: 3677,1416 3746,1451.43
  rectangle net VCC_3V3: 3685,1530 3750,1556
  rectangle net VCC_3V3: 3682,1633.5 3746,1661.5
  rectangle net VCC_5V: 445,578 617,784
  rectangle net VCC_3V3: 729,1351 931,1401
  rectangle net VCC_3V3: 729,1378 887,1425
  rectangle net VCC_3V3: 729,1400 822,1471
  rectangle net GND: 444,1840 633.71,1902
  rectangle net GND: -81,821 46,1192
  rectangle net GND: 1393,918 1448,973.5
  rectangle net VCC_3V3: 1693,530.5 1765,558.5
  rectangle net VCC_7V5: 354,965 614,1013
  rectangle net VCC_7V5: 196,760 236,882
  rectangle net VCC_3V3: 1603,1774 1651,1805
  rectangle net VCC_3V3: 995,1824 1092,1873
  rectangle net XH_OUT: 492,1379 612,1453
  rectangle net GND: 1569,1057 1621,1178
  rectangle net GND: 1442,1057 1621,1081
  rectangle net VCC_3V3: 1693,633 1770,661
  rectangle net VCC_3V3: 1693,737 1770,765
  rectangle net VCC_3V3: 1467,918 1508,1021
  rectangle net VCC_3V3: 1210,899.5 1279,927.5
  rectangle net VCC_3V3: 1210,794.5 1275,822.5
  rectangle net VCC_3V3: 1210,687 1279,715
  rectangle net VCC_3V3: 1210,583 1279,611
  rectangle net NRST: 91,1948 395,1996
  rectangle net VCC_3V3: 1698,842 1774,867
  rectangle net NetR3_2: 142,1186 216,1287
  rectangle net NetR2_2: 142,1576 216,1677
  rectangle net GND: 125,335 962,417
  rectangle net SHD: 398,679 436,784
  rectangle net GND: 318,335 362,794
  rectangle net VCC_5V: 445,429 912,601
  rectangle net GND: 318,791 617,825
  rectangle net SW: 479,839 909,946
  rectangle net GND: 441,809 472,884
  rectangle net FB: 254,734 297,849
  rectangle net FB: 254,838 430,884
  pour cut-out: 627,429.5 1055,429.5 1055,980.5 627,980.5
Bottom Layer:
  rectangle net I2C3#.I2C3_SDA#: 1816.58,1544.42 1854,1595.42
  rectangle net I2C2_SDA: 1468,1113 1503,1172
  rectangle net NetR134_1: 2785,855 2822,870
  rectangle net GND: 3483,850 3549,899
  rectangle net VCC_3V3: 3443,909.73 3498,976.5
  rectangle net VCC_3V3: 4232,885 4369,910
  rectangle net VCC_3V3: 4342,538 4369,909
  rectangle net VCC_3V3: 3993,891 4025,975
  rectangle net VCC_3V3: 3993,890 4135,931
  rectangle net VCC_3V3: 3857.83,939 4025,1069
  rectangle net VCC_3V3: 3857.83,592 3882,975
  rectangle net VCC_3V3: 3082,848 3260,878
  rectangle net VCC_3V3: 3234,592 3261,878
  rectangle net VCC_3V3: 3672,529 3700,940
  rectangle net VCC_3V3: 3082,539 3111,878
  rectangle net NetR134_1: 2772,862 2822,886
  rectangle net NetR119_1: 2783,895 2879,919
  rectangle net GND: 2744,415 2828,654
  rectangle net GND: 2784,602.92 2828,825
  rectangle net GND: 2836,837 2875,867
  rectangle net GND: 2784,814.48 2875,848
  rectangle net VCC_3V3: 4186,1412.91 4351,1791.93
  rectangle net GND: 2133,741 2247,829
  rectangle net VCC_3V3: 2328,885 2368,980
  rectangle net GND: 2211,795 2317,829
  rectangle net VCC_3V3: 1217.37,581 1266,970
  rectangle net VCC_3V3: 3433,828 3474,976.5
  rectangle net NetR138_1: 3360,938 3410,975
  rectangle net NetR144_1: 3486,809 3548,842
  rectangle net NetR119_1: 2829,882 2879,918
  rectangle net NetR7_1: 2256,859 2317,905
  rectangle net GND: 1738,1915 1774,1985.19
  rectangle net GND: 1738,1966 1805,2018
  rectangle net VCC_3V3: 1977,1780 2134,1835
  region net VCC_3V3: 1887,2018 1825,2018 1825,1966 1887,1966
  rectangle net MRST7: 2712,818.48 2775,853
  rectangle net VCC_3V3: 1977,1809 2622,1845
  rectangle net OLED_IO: 48,552 107,649
  rectangle net GND: 123,552 213,649
  rectangle net VCC_7V5: 221,462 285,649
  rectangle net NetQ1_1: 91,462 202.5,541
  rectangle net I2C3_SDA: 1764,1527 1799,1581
  rectangle net COl_14: 1685,1478 1725,1522
  rectangle net I2C1_SDA#: 754,1753 800,1800
  rectangle net VCC_3V3: 1053,1195 1668,1268
  rectangle net VCC_3V3: 1736,532 1761,871
  rectangle net NetR36_1: 4115,1678 4163,1725
  rectangle net NetR30_1: 3928,1758 3979,1802
  rectangle net VCC_3V3: 3959,1813 3987,1853
  rectangle net GND: 3935,1444 3976,1716
  region net GND: 4102,1717 3935,1717 3935,1651 4102,1651
  rectangle net VCC_3V3: 3105,1810 3597,1863
  rectangle net VCC_3V3: 3547,1751 3597,1815
  rectangle net NetR22_1: 2758,1744 2794,1784
  rectangle net GND: 2938,1749 2976,1860
  rectangle net VCC_3V3: 3103,1483 3236,1863
  rectangle net NetR29_1: 3308,1754 3366,1803
  rectangle net NetR10_1: 2145,1754 2189,1799
  rectangle net VCC_3V3: 2465,1457 2624,1845
  rectangle net GND: 2707,1812 2976,1860
  rectangle net VCC_3V3: 2301,1732 2622,1818
  rectangle net NetR21_1: 2686,1752 2744,1801
  rectangle net VCC_3V3: 2099,1780 2134,1816
  rectangle net VCC_3V3: 1520,863 1572,932
  rectangle net COl_16: 1675,1574.5 1715,1615
  rectangle net COl_15: 1685,1529 1725,1567.5
  rectangle net VCC_3V3: 1249,892 1389,927
  rectangle net VCC_3V3: 1102,917 1572,971
  rectangle net VCC_3V3: 993,1826 1772,1864
  rectangle net VCC_3V3: 1608,1222 1668,1863
  rectangle net GND: 1104,1283 1581,1804
  rectangle net VCC_3V3: 993,1195 1081,1857

## Silkscreen, mask and mechanical layers (free items; w line width, h text height)
Top Overlay:
  text "RESET" at 350,1989 h60
  text "&" at 93,1918 h60
  text "@" at 2946,1913.5 h35
  text "@" at 3568,1913.5 h35
  text "@" at 2328,1864 h35
  text "@" at 3006,1863.5 h35
  text "@" at 3111,1863.5 h35
  text "@" at 3625,1863.5 h35
  text "@" at 3731,1862.5 h35
  text "@" at 4184,1863 h35
  text "&" at 2152,1857 h60
  text "&" at 2796,1857 h60
  text "&" at 3394,1857 h60
  text "&" at 4009,1857 h60
  text "*" at 3808.65,1824.93 h100
  text "*" at 1958,1823.5 h100
  text "*" at 2569,1823.5 h100
  text "*" at 3187,1823.5 h100
  text "*" at 1997,1786 h100
  text "*" at 2608,1786 h100
  text "*" at 3226,1786 h100
  text "*" at 3847.65,1783.43 h100
  text "BOOT_0" at 135,1760 h60
  text "*" at 3030,1736.5 h100
  text "*" at 3642,1736.5 h100
  text "*" at 3105,1734.5 h100
  text "*" at 3718,1733 h100
  text "*" at 4262,1733.5 h100
  text "*" at 4337.65,1730.93 h100
  text "*" at 2406,1729.5 h100
  text "*" at 2480,1728 h100
  text "*" at 1958,1718.5 h100
  text "*" at 3187,1719 h100
  text "*" at 3808.65,1716.43 h100
  text "*" at 2569,1715.5 h100
  text "*" at 3226,1682.5 h100
  text "&" at 919,1681 h60
  text "*" at 1997,1679.5 h100
  text "*" at 2608,1679.5 h100
  text "*" at 3847.65,1676.43 h100
  text "*" at 3067,1666.5 h100
  text "*" at 3679,1666 h100
  text "*" at 4298.65,1663.43 h100
  text "*" at 2442,1661.5 h100
  text "*" at 3105,1628.5 h100
  text "*" at 3718,1627.5 h100
  text "*" at 2480,1626 h100
  text "*" at 4337.65,1625.43 h100
  text "*" at 3187,1617 h100
  text "*" at 3808.65,1611.93 h100
  text "*" at 1958,1609.5 h100
  text "*" at 2569,1609.5 h100
  text "*" at 3226,1580 h100
  text "*" at 1997,1572.5 h100
  text "*" at 2608,1573.5 h100
  text "*" at 3847.65,1573.43 h100
  text "*" at 3679,1562 h100
  text "*" at 3067,1561 h100
  text "*" at 4298.65,1557.43 h100
  text "*" at 2442,1556 h100
  text "@" at 736,1548 h35
  text "@" at 786,1523 h35
  text "*" at 3105,1523.5 h100
  text "*" at 3718,1523.5 h100
  text "@" at 204,1521 h35
  text "*" at 2480,1519 h100
  text "*" at 4337.65,1519.43 h100
  text "*" at 3187,1514 h100
  text "&" at 1889,1511 h60
  text "*" at 3808.65,1507.43 h100
  text "*" at 2569,1503.5 h100
  text "@" at 843,1499 h35
  text "*" at 1958,1499.5 h100
  text "*" at 3226,1474.5 h100
  text "@" at 899,1472 h35
  text "*" at 3847.65,1467.93 h100
  text "*" at 2608,1467 h100
  text "*" at 1997,1460.5 h100
  text "*" at 3679,1458 h100
  text "*" at 3067,1455.5 h100
  text "*" at 4298.65,1451.93 h100
  text "*" at 2442,1450.5 h100
  text "*" at 3105,1418.5 h100
  text "*" at 3718,1419 h100
  text "*" at 2480,1417 h100
  text "*" at 4337.65,1416.43 h100
  text "BOOT_1" at 135,1368 h60
  text "@" at 1131,1148 h35
  text "@" at 204,1131 h35
  text "@" at 1106,1093 h35
  text "@" at 1584,1021 h35
  text "&" at 1515,1020 h60
  text "@" at 1642,970.5 h35
  text "@" at 1747,970.5 h35
  text "&" at 1406,966 h60
  text "&" at 2167,965.5 h60
  text "&" at 2805,965.5 h60
  text "&" at 3410,964.5 h60
  text "&" at 4039,964.5 h60
  text "*" at 1207,933.5 h100
  text "*" at 2572.41,930.77 h100
  text "*" at 1957.59,929.63 h100
  text "*" at 3191.07,929.59 h100
  text "*" at 3813.24,928.57 h100
  text "*" at 2611.35,900.2 h100
  text "*" at 3848.17,898 h100
  text "*" at 1996.52,897.07 h100
  text "*" at 1247,896 h100
  text "*" at 3230,896.02 h100
  text "*" at 3027,849.7 h100
  text "*" at 2411.17,848.57 h100
  text "*" at 3646,847.52 h100
  text "*" at 4265.17,847.5 h100
  text "*" at 2486.17,845.57 h100
  text "*" at 3102,845.7 h100
  text "*" at 3721,844.52 h100
  text "*" at 4340.17,844.5 h100
  text "GND" at 30,842 h60
  text "*" at 1661,840.5 h100
  text "*" at 1736,837.5 h100
  text "*" at 2569.83,830.14 h100
  text "*" at 1207,828.5 h100
  text "*" at 1958,828 h100
  text "*" at 3191.48,826.96 h100
  text "*" at 3806.42,826.82 h100
  text "*" at 1996,792 h100
  text "*" at 2607.83,791.14 h100
  text "*" at 3229.48,790.96 h100
  text "*" at 3848.65,790.93 h100
  text "*" at 1247,789.5 h100
  text "*" at 2447.17,779.07 h100
  text "*" at 3682,778.02 h100
  text "*" at 4301.17,778 h100
  text "*" at 3063,777.2 h100
  text "*" at 1697,771 h100
  text "*" at 2486.17,741.57 h100
  text "*" at 4340.17,740.5 h100
  text "*" at 3102,738.7 h100
  text "*" at 3721,737.52 h100
  text "*" at 1736,733.5 h100
  text "*" at 2570.41,728.27 h100
  text "*" at 1954.59,725.13 h100
  text "*" at 3188.07,724.09 h100
  text "*" at 3807.24,724.07 h100
  text "*" at 1207,721 h100
  text "*" at 1993.59,690.13 h100
  text "*" at 2608.41,688.27 h100
  text "*" at 3227.07,687.09 h100
  text "*" at 3846.24,687.07 h100
  text "&" at 538,686 h60
  text "*" at 1247,683.5 h100
  text "*" at 2447.17,675.07 h100
  text "*" at 3063,675.2 h100
  text "*" at 3682,674.02 h100
  text "*" at 4301.17,674 h100
  text "*" at 1697,667 h100
  text "DP" at 30,665 h60
  text "*" at 3102,638.7 h100
  text "*" at 2486.17,637.57 h100
  text "*" at 4340.17,636.5 h100
  text "*" at 3721,634.52 h100
  text "*" at 1736,629.5 h100
  text "*" at 2570.41,625.27 h100
  text "*" at 1954.59,624.13 h100
  text "*" at 3188.07,623.09 h100
  text "*" at 3807.24,623.07 h100
  text "*" at 1207,616.5 h100
  text "*" at 2609.41,586.27 h100
  text "*" at 1993.59,585.13 h100
  text "*" at 3227.07,584.09 h100
  text "*" at 3846.24,584.07 h100
  text "*" at 1247,580 h100
  text "*" at 2447.17,572.57 h100
  text "*" at 3063,572.7 h100
  text "*" at 4301.17,571.5 h100
  text "*" at 3682,568 h100
  text "*" at 1697,564.5 h100
  text "&" at 394,552 h60
  text "*" at 2486.17,535.07 h100
  text "*" at 4340.17,534 h100
  text "*" at 3721,533.02 h100
  text "*" at 3102,531.2 h100
  text "*" at 1736,527 h100
  text "DM" at 30,489 h60
  text "&" at 575,327 h60
  text "5V" at 30,312 h60
  text "I2C_LINES" at 910,243 h70
Bottom Overlay:
  text "&" at 1907,1966 h60
  text "@" at 1387,1939 h35
  text "@" at 1437,1939 h35
  text "@" at 1486,1939 h35
  text "@" at 1535,1939 h35
  text "@" at 1584,1939 h35
  text "@" at 1633,1939 h35
  text "@" at 3356,1877.5 h35
  text "@" at 2733,1875.5 h35
  text "&" at 1139,1872 h60
  text "@" at 3969,1864 h35
  text "@" at 2173,1861.5 h35
  text "@" at 2783,1859 h35
  text "@" at 3406,1848.5 h35
  text "@" at 2124,1829.5 h35
  text "@" at 3582,1798.5 h35
  text "@" at 2327,1797.5 h35
  text "@" at 2966,1797.5 h35
  text "@" at 4044,1791 h35
  text "&" at 1683,1765 h60
  text "Note:" at 284.46,1725.46 h80
  text "@" at 4185,1696 h35
  text "* >> 47K" at 285,1662 h80
  text "&" at 1039,1625 h60
  text "@ >> 10K" at 285,1583.92 h80
  text "@" at 1753,1580 h35
  text "&" at 1039,1555 h60
  text "@" at 1753,1531 h35
  text "& >> 0.1uF" at 280.17,1526 h80
  text "@" at 1753,1483 h35
  text "&" at 1039,1396 h60
  text "&" at 1078,1294 h60
  text "@" at 966,1264 h35
  text "&" at 1141,1177 h60
  text "&" at 1576,1177 h60
  text "@" at 3973,986.5 h35
  text "@" at 1436,984.5 h35
  text "@" at 1382,956.5 h35
  text "@" at 3370,940.5 h35
  text "@" at 2354,936.5 h35
  text "@" at 4079,934.5 h35
  text "@" at 2742.25,926.75 h35
  text "@" at 2865,927.5 h35
  text "@" at 3515.25,915.5 h35
  text "@" at 1556,908 h35
  text "@" at 2306,902.5 h35
  text "@" at 2813.5,902 h35
  text "@" at 2238.5,901 h35
  text "@" at 4023.83,900.33 h35
  text "@" at 3370,890.5 h35
  text "@" at 4207.64,848.14 h35
  text "@" at 3427,784.5 h35
  text "@" at 2340,750.5 h35
  text "@" at 2916,746.5 h35
  text "*" at 78,577 h100
  text "&" at 314,555 h60
  text "*" at 281,474 h100
Mechanical 2:
  lines w10: 1389,601 1392,601 ; 4580,-83 4580,2070 ; -87,-83 4680.01,-83 4680,2070 -87,2070 -87,-83

## Dimensions
0,0 to 4593,4 on Mechanical 1
0,0 to 0,1983 on Mechanical 1
-87,-83 to -87,2070 on Mechanical 1
-87,-83 to 4680.01,-83 on Mechanical 1